# Altium PCB bdcmc25_revised.PcbDoc (part 1 of 4)
Units mil, origin at the board's own origin, x right, y up, seen from the top; angles counter-clockwise.
Board outline 7000 x 2750 mil, 4 copper layers (Top Layer, Layer 2 (GND), Layer 3 (GND), Bottom Layer), stack 23.756 mil thick; 347 components, 158 nets, 1046 pads, 1117 vias.
Unrouted connection lines stored in the file: 6.
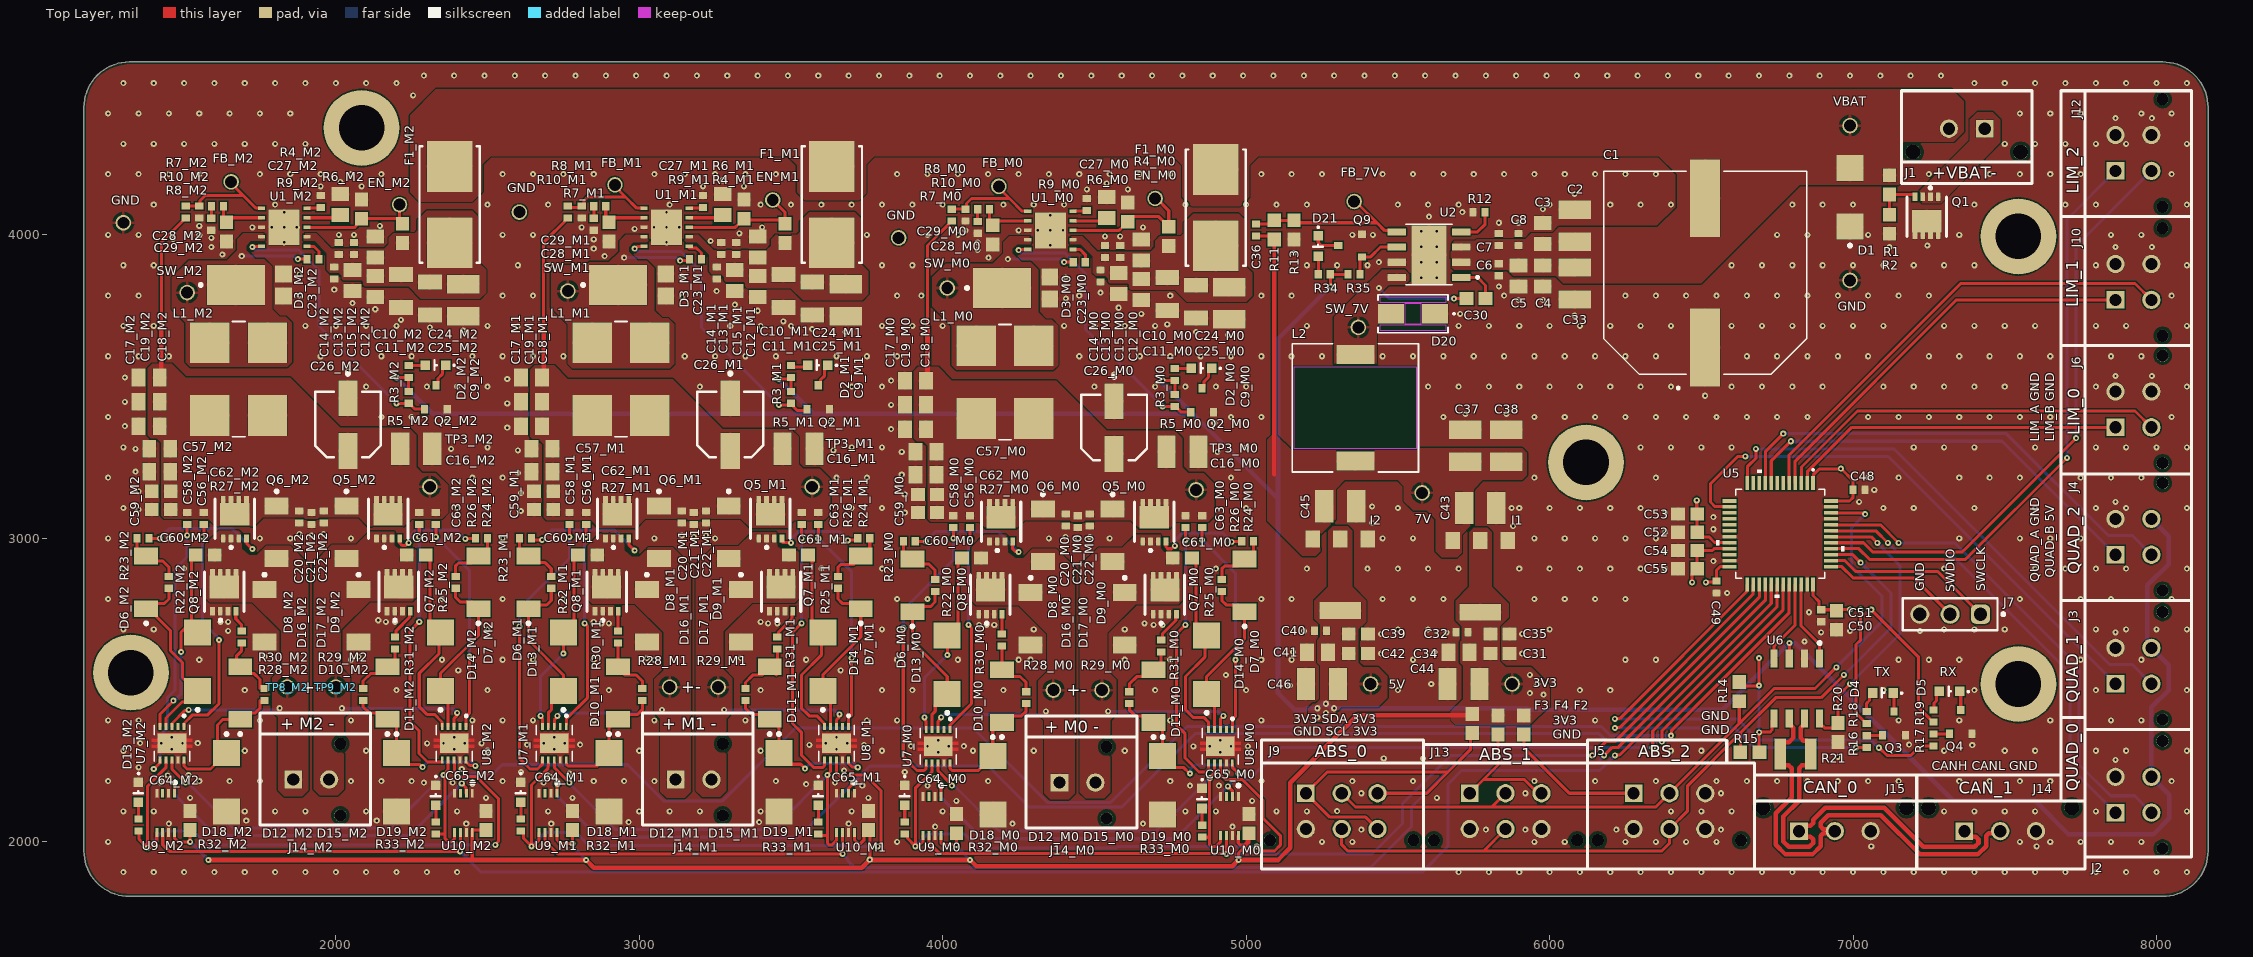
[diagram p0: Top Layer view]
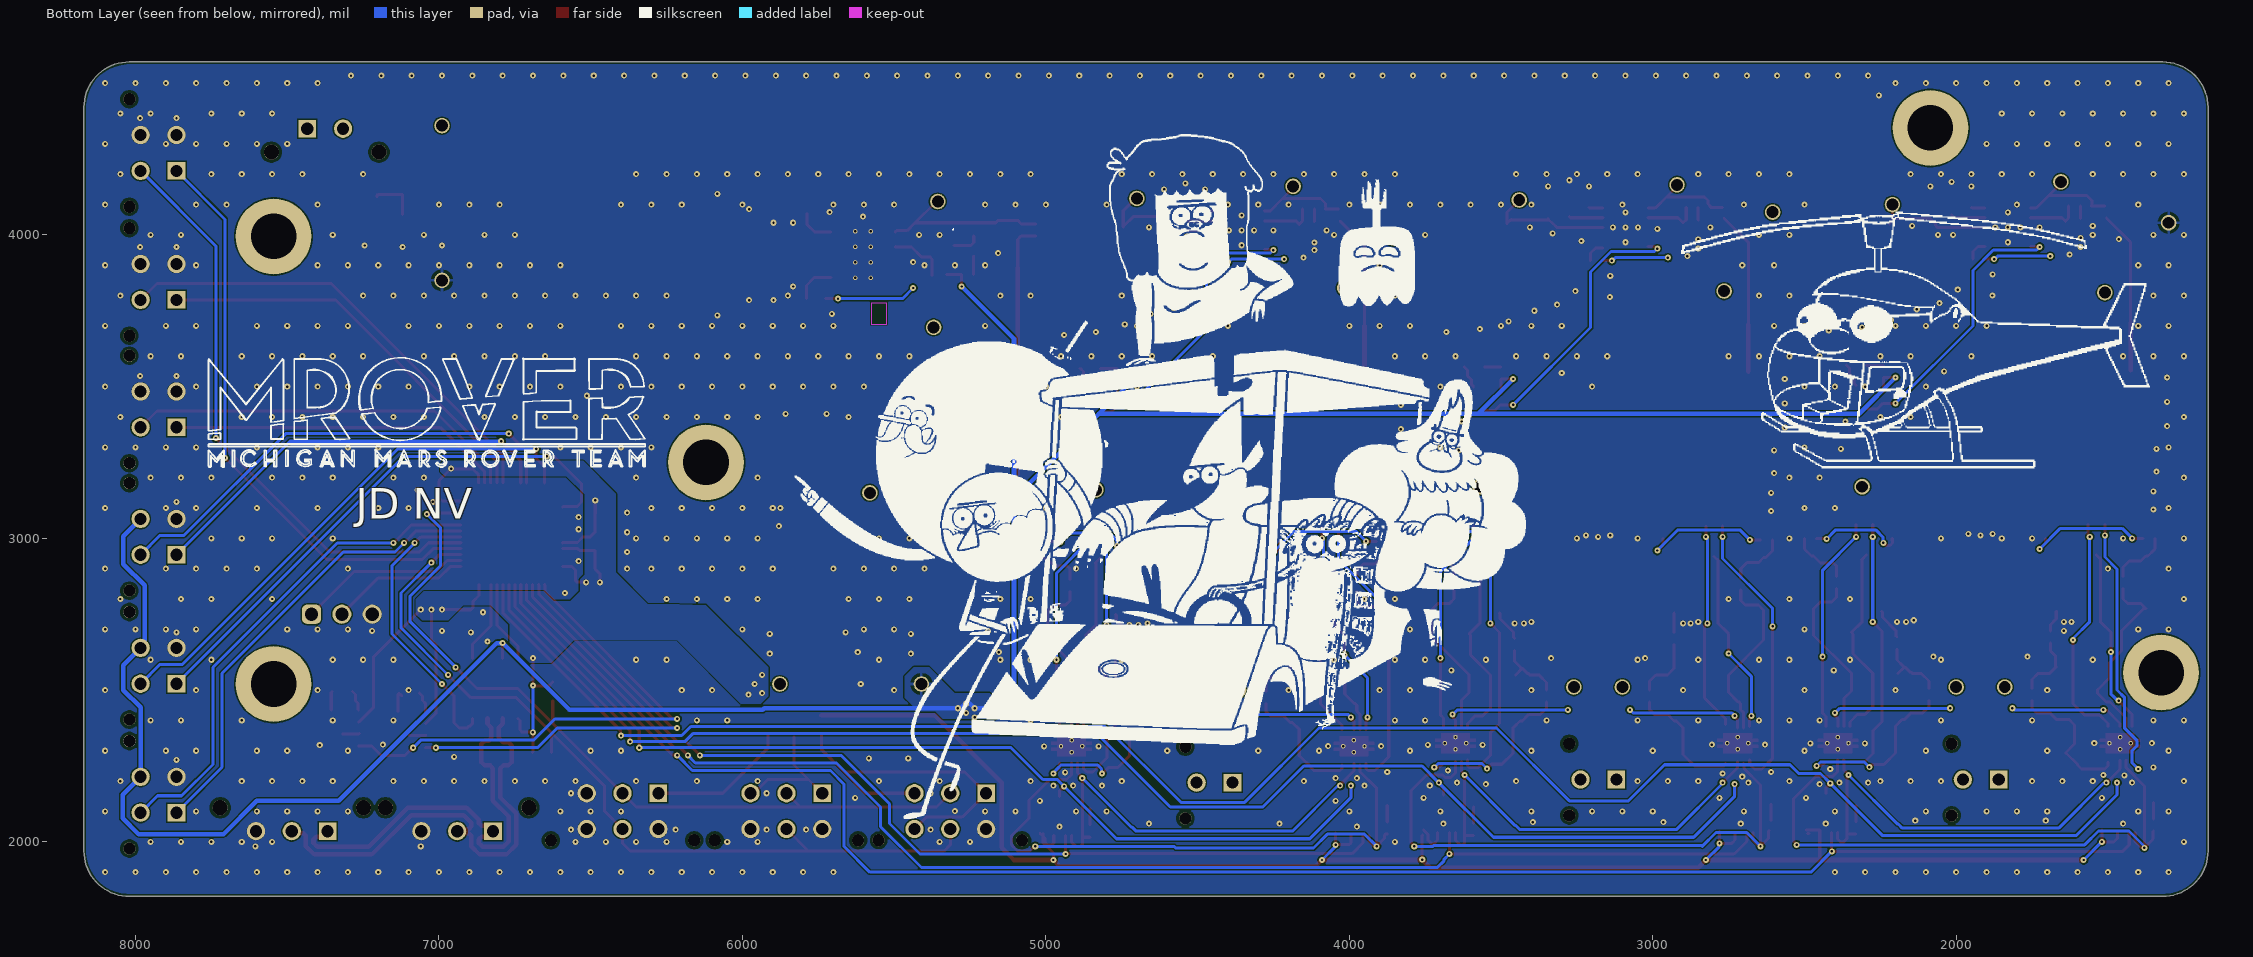
[diagram p1: Bottom Layer view, seen from below]
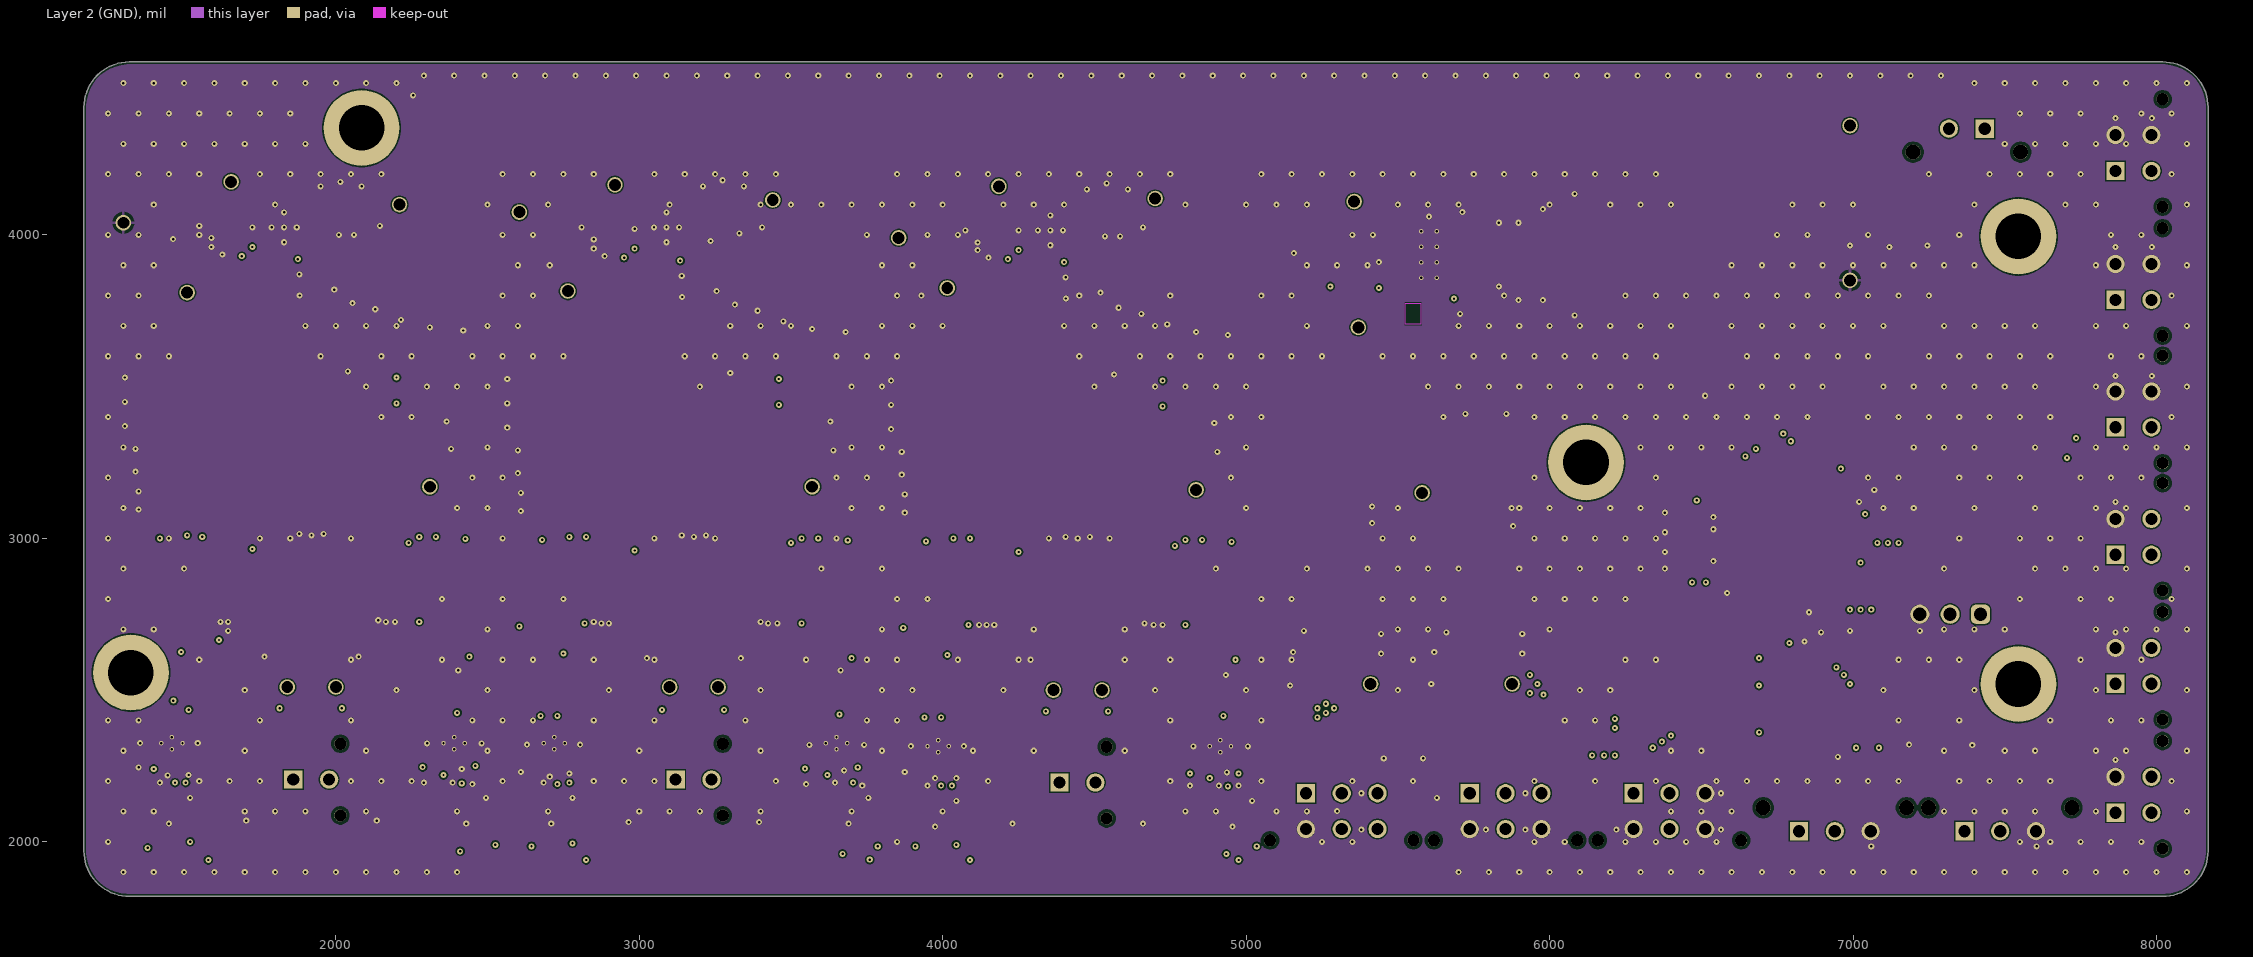
[diagram p2: Layer 2 (GND)]
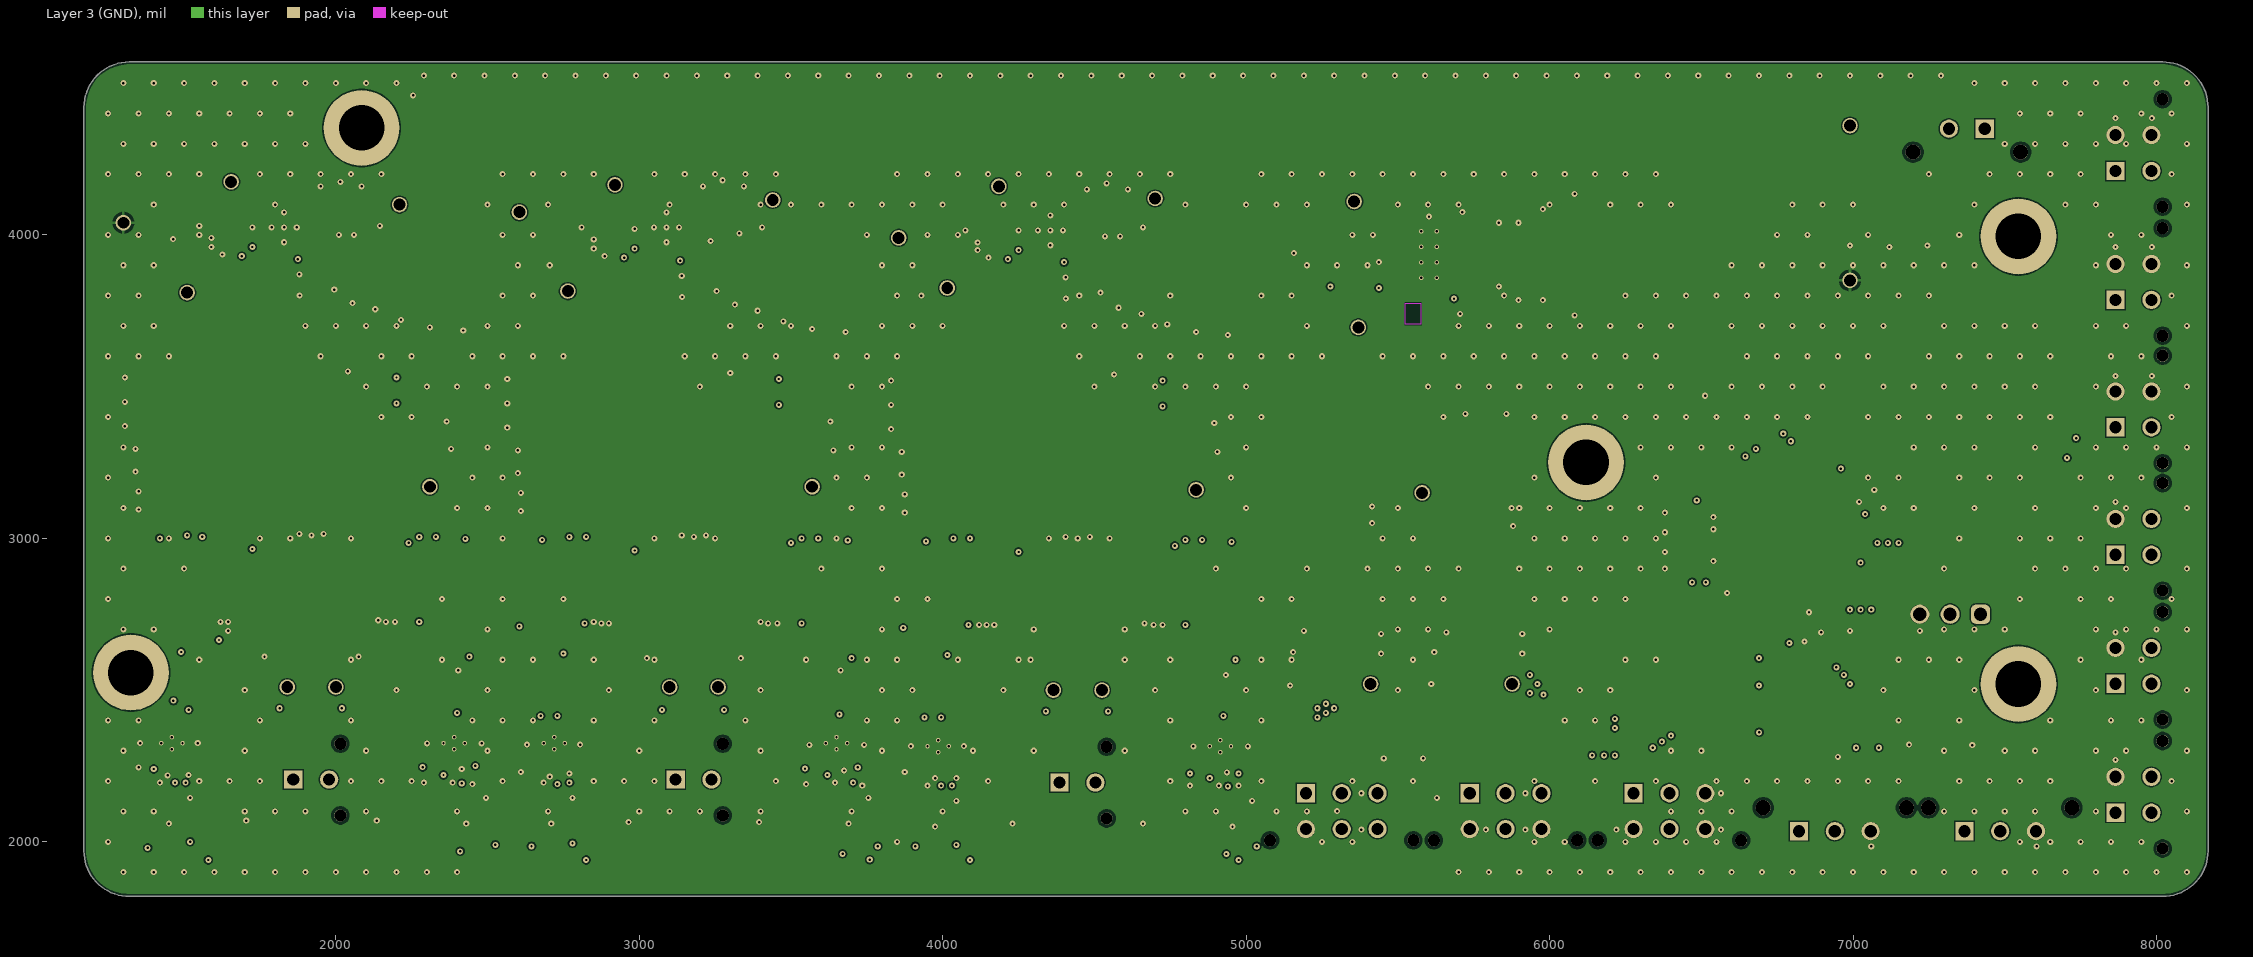
[diagram p3: Layer 3 (GND)]

## Layer stack, top to bottom
Top Solder: solder mask 0.4, Solder Resist, Dk 3.5
Top Layer: signal copper 1.4
Dielectric 2: prepreg 2.8, PP-006, Dk 4.1
Layer 2 (GND): signal copper 1.378
Dielectric 1: dielectric 12.6, FR-4, Dk 4.8
Layer 3 (GND): signal copper 1.378
Dielectric 5: prepreg 2.8, PP-006, Dk 4.1
Bottom Layer: signal copper 1.4
Bottom Solder: solder mask 0.4, Solder Resist, Dk 3.5

## Board outline
1170,1970 1170,4420 cw(c1320,4420) 1320,4570 8020,4570 cw(c8020,4420) 8170,4420 8170,1970 cw(c8020,1970) 8020,1820 1320,1820 cw(c1320,1970)

## Design rules (kind name [scope] priority, off if disabled: settings)
BoardOutlineClearance [All] p1: gap=7.87 ignorepadtopadclearanceinfootprint=FALSE
Clearance [All] p1: gap=4 ignorepadtopadclearanceinfootprint=FALSE except(5: Arc-Via Track-Via SMDPad-Via THPad-Via Via-Via Via-Fill Via-Poly Via-Region Via-Text; 9.84: Arc-Hole Track-Hole SMDPad-Hole THPad-Hole Via-Hole Fill-Hole Poly-Hole Region-Hole Text-Hole)
ComponentClearance [All] p1: gap=4 collisioncheckmode=3 verticalgap=4 showdistances=TRUE
DiffPairsRouting DiffPair_DiffPairsRouting [InDifferentialPair ('CAN')] p1: maxlimit=10 minlimit=10 mostfreqgap=10 toplayer_minwidth=15 toplayer_maxwidth=15 toplayer_prefwidth=15 midlayer1_minwidth=15 midlayer1_maxwidth=15 midlayer1_prefwidth=15 midlayer2_minwidth=15 midlayer2_maxwidth=15 midlayer2_prefwidth=15 bottomlayer_minwidth=15 bottomlayer_maxwidth=15 bottomlayer_prefwidth=15 maxuncoupledlength=500
DiffPairsRouting DiffPair_DiffPairsRouting_1 [InDifferentialPair ('CAN')] p2: maxlimit=5 minlimit=5 mostfreqgap=5 toplayer_minwidth=2 toplayer_maxwidth=2 toplayer_prefwidth=2 midlayer1_minwidth=0.59 midlayer1_maxwidth=0.59 midlayer1_prefwidth=0.59 midlayer2_minwidth=0.59 midlayer2_maxwidth=0.59 midlayer2_prefwidth=0.59 bottomlayer_minwidth=2 bottomlayer_maxwidth=2 bottomlayer_prefwidth=2 impedanceprofiledriven=TRUE impedanceprofileid={AFAFF1AD-85D3-44F0-8B6C-0EA1EA1200DB} impedanceprofilevalue=120.000000 maxuncoupledlength=500
DiffPairsRouting DiffPair_DiffPairsRouting_2 [InDifferentialPair ('CAN')] p3: maxlimit=10 minlimit=10 mostfreqgap=10 toplayer_minwidth=15 toplayer_maxwidth=15 toplayer_prefwidth=15 midlayer1_minwidth=15 midlayer1_maxwidth=15 midlayer1_prefwidth=15 midlayer2_minwidth=15 midlayer2_maxwidth=15 midlayer2_prefwidth=15 bottomlayer_minwidth=15 bottomlayer_maxwidth=15 bottomlayer_prefwidth=15 maxuncoupledlength=500
DiffPairsRouting [All] p4: maxlimit=4 minlimit=4 mostfreqgap=4 toplayer_minwidth=4 toplayer_maxwidth=71497.94 toplayer_prefwidth=4 midlayer1_minwidth=4 midlayer1_maxwidth=71497.94 midlayer1_prefwidth=4 midlayer2_minwidth=4 midlayer2_maxwidth=71497.94 midlayer2_prefwidth=4 bottomlayer_minwidth=4 bottomlayer_maxwidth=71497.94 bottomlayer_prefwidth=4 maxuncoupledlength=500
Height [All] p1: minheight=0 maxheight=71497.94 prefheight=500
HoleSize [All] p1: absolutevalues=TRUE maxlimit=248.03 minlimit=7.87 maxpercent=80.000 minpercent=20.000
HoleToHoleClearance [All] p1: gap=9.84 allowstackedmicrovias=FALSE
MatchedLengths DiffPair_MatchedLengths [InDifferentialPair ('CAN')] p1: tolerance=1000 checknetsindiffpair=FALSE checkdiffpairvsdiffpair=TRUE checkxsignals=TRUE checkothers=TRUE
MatchedLengths DiffPair_MatchedLengths_1 [InDifferentialPair ('CAN')] p2: tolerance=1000 checknetsindiffpair=FALSE checkdiffpairvsdiffpair=TRUE checkxsignals=TRUE checkothers=TRUE
MatchedLengths DiffPair_MatchedLengths_2 [InDifferentialPair ('CAN')] p3: tolerance=1000 checknetsindiffpair=FALSE checkdiffpairvsdiffpair=TRUE checkxsignals=TRUE checkothers=TRUE
MinimumAnnularRing [All] p1: minimumring=3
MinimumSolderMaskSliver [All] p1: minsoldermaskwidth=0
PlaneClearance [All] p1: clearance=4
PlaneConnect PlaneConnectPowerPads [InPadClass('PowerPads')] p1: planeconnectstyle=Direct reliefexpansion=20 reliefentries=4 reliefconductorwidth=10 reliefairgap=10
PlaneConnect [All] p2: pad.planeconnectstyle=Relief pad.reliefexpansion=11.81 pad.reliefentries=4 pad.reliefconductorwidth=4 pad.reliefairgap=4 via.planeconnectstyle=Direct via.reliefexpansion=11.81 via.reliefentries=4 via.reliefconductorwidth=5 via.reliefairgap=5
PolygonConnect PolygonConnect_1 [InNetClass('All Nets') vs InNet('No Net')] p1: connectstyle=Direct reliefconductorwidth=10 reliefentries=4 polygonreliefangle="90 Angle" airgapwidth=10
RoutingVias [All] p1: holewidth=7.87 width=17.72 viastyle="Through Hole" minholewidth=7.87 minwidth=17.72 maxholewidth=248.03 maxwidth=257.87
SilkToSilkClearance [All] p1: silktosilkclearance=0
SilkToSolderMaskClearance [IsPad] p1: minsilkscreentomaskgap=4 clearancetoexposedcopper=TRUE
SolderMaskExpansion [All] p1: expansion=2.95 istentingtop=FALSE
Width [All] p1: maxlimit=71497.94 minlimit=4 preferedwidth=4
20 further rules are at their usual default settings.

## Classes and differential pairs
channel class Motor_Control: M0 M1 M2
channel class 12V_Buck_Motor: M0 M1 M2
component class M2: C56_M2 C57_M2 C58_M2 C59_M2 C60_M2 C61_M2 C62_M2 C63_M2 C64_M2 C65_M2 D6_M2 D7_M2 D8_M2 D9_M2 D10_M2 D11_M2 D12_M2 D13_M2 D14_M2 D15_M2 D16_M2 D17_M2 D18_M2 D19_M2 J14_M2 Q5_M2 Q6_M2 Q7_M2 Q8_M2 R22_M2 R23_M2 R24_M2 R25_M2 R26_M2 R27_M2 R28_M2 R29_M2 R30_M2 R31_M2 R32_M2 R33_M2 TP8_M2 TP9_M2 U7_M2 U8_M2 U9_M2 U10_M2
component class M1: C56_M1 C57_M1 C58_M1 C59_M1 C60_M1 C61_M1 C62_M1 C63_M1 C64_M1 C65_M1 D6_M1 D7_M1 D8_M1 D9_M1 D10_M1 D11_M1 D12_M1 D13_M1 D14_M1 D15_M1 D16_M1 D17_M1 D18_M1 D19_M1 J14_M1 Q5_M1 Q6_M1 Q7_M1 Q8_M1 R22_M1 R23_M1 R24_M1 R25_M1 R26_M1 R27_M1 R28_M1 R29_M1 R30_M1 R31_M1 R32_M1 R33_M1 TP8_M1 TP9_M1 U7_M1 U8_M1 U9_M1 U10_M1
component class M0: C56_M0 C57_M0 C58_M0 C59_M0 C60_M0 C61_M0 C62_M0 C63_M0 C64_M0 C65_M0 D6_M0 D7_M0 D8_M0 D9_M0 D10_M0 D11_M0 D12_M0 D13_M0 D14_M0 D15_M0 D16_M0 D17_M0 D18_M0 D19_M0 J14_M0 Q5_M0 Q6_M0 Q7_M0 Q8_M0 R22_M0 R23_M0 R24_M0 R25_M0 R26_M0 R27_M0 R28_M0 R29_M0 R30_M0 R31_M0 R32_M0 R33_M0 TP8_M0 TP9_M0 U7_M0 U8_M0 U9_M0 U10_M0
component class "Input Power": C1 C2 C3 C4 C5 C6 C7 C8 D1 J1 Q1 R1 R2 TP1 TP2
component class Designator: C49 C50 C51 C52 C53 C54 C55 D4 D5 F2 F3 F4 F? J2 J3 J4 J5 J6 J7 J9 J10 J12 J13 J14 J15 Q3 Q4 R14 R15 R16 R17 R18 R19 R20 R21 TP7 U5 U6
differential pair CAN: +CAN_P -CAN_N

## Components (designator, comment, footprint, x,y, rotation, side; value= is the part's Value field where it differs from the comment)
3V3 "5003" TEST-POINT-0001#1 5876.5,2520 r0 top (schematic designator TP5)
5V "5003" TEST-POINT-0001#1 5410,2520 r0 top (schematic designator TP6)
7V "5003" TEST-POINT-0001#1 5580,3150 r0 top (schematic designator TP4)
C1 "EEETK2A101AM" CAP-100U-0001 6512.59,3875 r90 top
C2 "CL32B106KBJNNNE" CAP-1210 6082.59,4030 r270 top
C3 "CC0805KKX7R9BB105" CAP-0805 5977.59,4005 r270 top
C4 "CC0805KRX7R9BB104" CAP-0805 5977.59,3865 r90 top
C5 "GRM2195C1H103JA01D" CAP-0805 5897.59,3865 r90 top
C6 "CC0402KRX7R9BB102" CAP-0402 5832.59,3885 r90 top
C7 "CC0402JRNPO9BN101" CAP-0402 5832.59,3985 r270 top
C8 "CC0402JRNPO9BN100" CAP-0402 5897.59,3985 r270 top
C9_M0 "CL32B106KBJNNNE" CAP-1210 4945,3775 r90 top (schematic designator C9)
C9_M1 "CL32B106KBJNNNE" CAP-1210 3680,3785 r90 top (schematic designator C9)
C9_M2 "CL32B106KBJNNNE" CAP-1210 2420,3785 r90 top (schematic designator C9)
C10_M0 "CC0805KKX7R9BB105" CAP-0805 4655,3950 r270 top (schematic designator C10)
C10_M1 "CC0805KKX7R9BB105" CAP-0805 3390,3960 r270 top (schematic designator C10)
C10_M2 "CC0805KKX7R9BB105" CAP-0805 2130,3960 r270 top (schematic designator C10)
C11_M0 "CC0805KRX7R9BB104" CAP-0805 4655,3820 r90 top (schematic designator C11)
C11_M1 "CC0805KRX7R9BB104" CAP-0805 3390,3830 r90 top (schematic designator C11)
C11_M2 "CC0805KRX7R9BB104" CAP-0805 2130,3830 r90 top (schematic designator C11)
C12_M0 "GRM2195C1H103JA01D" CAP-0805 4580,3840 r90 top (schematic designator C12)
C12_M1 "GRM2195C1H103JA01D" CAP-0805 3315,3850 r90 top (schematic designator C12)
C12_M2 "GRM2195C1H103JA01D" CAP-0805 2055,3850 r90 top (schematic designator C12)
C13_M0 "CC0402JRNPO9BN101" CAP-0402 4520,3864.68 r90 top (schematic designator C13)
C13_M1 "CC0402JRNPO9BN101" CAP-0402 3255,3874.68 r90 top (schematic designator C13)
C13_M2 "CC0402JRNPO9BN101" CAP-0402 1995,3874.68 r90 top (schematic designator C13)
C14_M0 "CC0402JRNPO9BN100" CAP-0402 4535,3945 r270 top (schematic designator C14)
C14_M1 "CC0402JRNPO9BN100" CAP-0402 3270,3955 r270 top (schematic designator C14)
C14_M2 "CC0402JRNPO9BN100" CAP-0402 2010,3955 r270 top (schematic designator C14)
C15_M0 "CC0402KRX7R9BB102" CAP-0402 4585,3945 r270 top (schematic designator C15)
C15_M1 "CC0402KRX7R9BB102" CAP-0402 3320,3955 r270 top (schematic designator C15)
C15_M2 "CC0402KRX7R9BB102" CAP-0402 2060,3955 r270 top (schematic designator C15)
C16_M0 "CL32B106KBJNNNE" CAP-1210 4790,3285 r180 top (schematic designator C16)
C16_M1 "CL32B106KBJNNNE" CAP-1210 3525,3295 r180 top (schematic designator C16)
C16_M2 "CL32B106KBJNNNE" CAP-1210 2265,3295 r180 top (schematic designator C16)
C17_M0 "CC0805KKX7R9BB105" CAP-0805 3910,3520 r0 top (schematic designator C17)
C17_M1 "CC0805KKX7R9BB105" CAP-0805 2645,3530 r0 top (schematic designator C17)
C17_M2 "CC0805KKX7R9BB105" CAP-0805 1385,3530 r0 top (schematic designator C17)
C18_M0 "CC0805KRX7R9BB104" CAP-0805 3910,3440 r0 top (schematic designator C18)
C18_M1 "CC0805KRX7R9BB104" CAP-0805 2645,3450 r0 top (schematic designator C18)
C18_M2 "CC0805KRX7R9BB104" CAP-0805 1385,3450 r0 top (schematic designator C18)
C19_M0 "GRM2195C1H103JA01D" CAP-0805 3910,3360 r0 top (schematic designator C19)
C19_M1 "GRM2195C1H103JA01D" CAP-0805 2645,3370 r0 top (schematic designator C19)
C19_M2 "GRM2195C1H103JA01D" CAP-0805 1385,3370 r0 top (schematic designator C19)
C20_M0 "CC0402KRX7R9BB102" CAP-0402 4405,3060 r90 top (schematic designator C20)
C20_M1 "CC0402KRX7R9BB102" CAP-0402 3140,3070 r90 top (schematic designator C20)
C20_M2 "CC0402KRX7R9BB102" CAP-0402 1880,3070 r90 top (schematic designator C20)
C21_M0 "CC0402JRNPO9BN101" CAP-0402 4445,3055 r90 top (schematic designator C21)
C21_M1 "CC0402JRNPO9BN101" CAP-0402 3180,3065 r90 top (schematic designator C21)
C21_M2 "CC0402JRNPO9BN101" CAP-0402 1920,3065 r90 top (schematic designator C21)
C22_M0 "CC0402JRNPO9BN100" CAP-0402 4485,3060 r90 top (schematic designator C22)
C22_M1 "CC0402JRNPO9BN100" CAP-0402 3220,3070 r90 top (schematic designator C22)
C22_M2 "CC0402JRNPO9BN100" CAP-0402 1960,3070 r90 top (schematic designator C22)
C23_M0 "CC0402KRX7R7BB104" CAP-0402 4450,3910 r180 top (schematic designator C23)
C23_M1 "CC0402KRX7R7BB104" CAP-0402 3185,3920 r180 top (schematic designator C23)
C23_M2 "CC0402KRX7R7BB104" CAP-0402 1925,3920 r180 top (schematic designator C23)
C24_M0 "CC1206KKX7R0BB225" CAP-1206 4740,3805 r90 top (schematic designator C24)
C24_M1 "CC1206KKX7R0BB225" CAP-1206 3475,3815 r90 top (schematic designator C24)
C24_M2 "CC1206KKX7R0BB225" CAP-1206 2215,3815 r90 top (schematic designator C24)
C25_M0 "CC1206KKX7R0BB225" CAP-1206 4835,3780 r90 top (schematic designator C25)
C25_M1 "CC1206KKX7R0BB225" CAP-1206 3570,3790 r90 top (schematic designator C25)
C25_M2 "CC1206KKX7R0BB225" CAP-1206 2310,3790 r90 top (schematic designator C25)
C26_M0 "16SVPG47M" CAP-47U-0001 4565,3365 r270 top (schematic designator C26)
C26_M1 "16SVPG47M" CAP-47U-0001 3300,3375 r270 top (schematic designator C26)
C26_M2 "16SVPG47M" CAP-47U-0001 2040,3375 r270 top (schematic designator C26)
C27_M0 "GRM2165C1H272JA01D" CAP-0805 4540,4090 r270 top (schematic designator C27)
C27_M1 "GRM2165C1H272JA01D" CAP-0805 3275,4100 r270 top (schematic designator C27)
C27_M2 "GRM2165C1H272JA01D" CAP-0805 2015,4100 r270 top (schematic designator C27)
C28_M0 "CC0603CRNPO0BN6R8" CAP-0603 4165,4000 r90 top (schematic designator C28)
C28_M1 "CC0603CRNPO0BN6R8" CAP-0603 2900,4010 r90 top (schematic designator C28)
C28_M2 "CC0603CRNPO0BN6R8" CAP-0603 1640,4010 r90 top (schematic designator C28)
C29_M0 "0402N511J500CT" CAP-0402 4115,4025 r90 top (schematic designator C29)
C29_M1 "0402N511J500CT" CAP-0402 2850,4035 r90 top (schematic designator C29)
C29_M2 "0402N511J500CT" CAP-0402 1590,4035 r90 top (schematic designator C29)
C30 "CC0603KRX7R0BB104" CAP-0603 5757.59,3790 r180 top
C31 "CC0603KRX5R6BB106" CAP-0603 5836.5,2620 r180 top
C32 "CC0402KRX7R7BB104" CAP-0402 5711.5,2690 r0 top
C33 "CL32B106KBJNNNE" CAP-1210 6082.59,3840 r90 top
C34 "CC0805JRNPO9BN471" CAP-0805 5701.5,2625 r0 top
C35 "CC0603KRX7R0BB104" CAP-0603 5836.5,2685 r180 top
C36 "GRM155R71H391KA01D" CAP-0402 5032.59,4016.5 r90 top
C37 "C5750X5R1A686MT000N" CAP-1210 5722.59,3305 r270 top
C38 "C5750X5R1A686MT000N" CAP-1210 5857.59,3305 r270 top
C39 "CC0603KRX5R6BB106" CAP-0603 5370,2685 r180 top
C40 "CC0402KRX7R7BB104" CAP-0402 5245,2695 r0 top
C41 "CC0805JRNPO9BN471" CAP-0805 5235,2625 r0 top
C42 "CC0603KRX7R0BB104" CAP-0603 5370,2620 r180 top
C43 "293D106X9016A2TE3" CAP-1210 5771.5,3100 r180 top
C44 "293D106X9016A2TE3" CAP-1210 5716.5,2520 r0 top
C45 "293D106X9016A2TE3" CAP-1210 5310,3105 r180 top
C46 "293D106X9016A2TE3" CAP-1210 5250,2520 r0 top
C48 "CC0402KRX7R7BB104" CAP-0402 7020,3160 r180 top
C49 "CC0402KRX7R7BB104" CAP-0402 6550,2840 r90 top
C50 "CC0402KRX7R7BB104" CAP-0402 6895,2745 r90 top
C51 "CC0603KRX5R8BB475" CAP-0603 6945,2730 r90 top
C52 "CC0603KPX7R9BB103" CAP-0603 6455,3020 r0 top
C53 "CC0603KRX7R7BB105" CAP-0603 6455,3080 r0 top
C54 "CC0603KPX7R9BB103" CAP-0603 6455,2960 r0 top
C55 "CC0603KRX7R7BB105" CAP-0603 6455,2900 r0 top
C56_M0 "CC0805KKX7R9BB105" CAP-0805 3945,3210 r0 top (schematic designator C56)
C56_M1 "CC0805KKX7R9BB105" CAP-0805 2680,3220 r0 top (schematic designator C56)
C56_M2 "CC0805KKX7R9BB105" CAP-0805 1420,3220 r0 top (schematic designator C56)
C57_M0 "CC0805KKX7R9BB105" CAP-0805 3945,3285 r180 top (schematic designator C57)
C57_M1 "CC0805KKX7R9BB105" CAP-0805 2680,3295 r180 top (schematic designator C57)
C57_M2 "CC0805KKX7R9BB105" CAP-0805 1420,3295 r180 top (schematic designator C57)
C58_M0 "CC0603KPX7R9BB103" CAP-0603 3950,3145 r0 top (schematic designator C58)
C58_M1 "CC0603KPX7R9BB103" CAP-0603 2685,3155 r0 top (schematic designator C58)
C58_M2 "CC0603KPX7R9BB103" CAP-0603 1425,3155 r0 top (schematic designator C58)
C59_M0 "CC0603KPX7R9BB103" CAP-0603 3950,3085 r180 top (schematic designator C59)
C59_M1 "CC0603KPX7R9BB103" CAP-0603 2685,3095 r180 top (schematic designator C59)
C59_M2 "CC0603KPX7R9BB103" CAP-0603 1425,3095 r180 top (schematic designator C59)
C60_M0 "CC0603KRX7R0BB104" CAP-0603 4095,2935 r180 top (schematic designator C60)
C60_M1 "CC0603KRX7R0BB104" CAP-0603 2830,2945 r180 top (schematic designator C60)
C60_M2 "CC0603KRX7R0BB104" CAP-0603 1570,2945 r180 top (schematic designator C60)
C61_M0 "CC0603KRX7R0BB104" CAP-0603 4790,2935 r0 top (schematic designator C61)
C61_M1 "CC0603KRX7R0BB104" CAP-0603 3525,2945 r0 top (schematic designator C61)
C61_M2 "CC0603KRX7R0BB104" CAP-0603 2265,2945 r0 top (schematic designator C61)
C62_M0 "CC0402KRX7R9BB102" CAP-0402 4035,3055 r270 top (schematic designator C62)
C62_M1 "CC0402KRX7R9BB102" CAP-0402 2770,3065 r270 top (schematic designator C62)
C62_M2 "CC0402KRX7R9BB102" CAP-0402 1510,3065 r270 top (schematic designator C62)
C63_M0 "CC0402KRX7R9BB102" CAP-0402 4800,3055 r90 top (schematic designator C63)
C63_M1 "CC0402KRX7R9BB102" CAP-0402 3535,3065 r90 top (schematic designator C63)
C63_M2 "CC0402KRX7R9BB102" CAP-0402 2275,3065 r90 top (schematic designator C63)
C64_M0 "CC0603KRX7R0BB104" CAP-0603 4045,2060 r90 top (schematic designator C64)
C64_M1 "CC0603KRX7R0BB104" CAP-0603 2780,2070 r90 top (schematic designator C64)
C64_M2 "CC0603KRX7R0BB104" CAP-0603 1520,2070 r90 top (schematic designator C64)
C65_M0 "CC0603KRX7R0BB104" CAP-0603 5010,2060 r90 top (schematic designator C65)
C65_M1 "CC0603KRX7R0BB104" CAP-0603 3755,2070 r90 top (schematic designator C65)
C65_M2 "CC0603KRX7R0BB104" CAP-0603 2495,2070 r90 top (schematic designator C65)
D1 "SMBJ40CA" "DO-214AA (SMBJ)" 6990,4125 r270 top
D2_M0 "BL-HKC36G-AV-TRB" LED-0603 4910,3590 r180 top (schematic designator D2)
D2_M1 "BL-HKC36G-AV-TRB" LED-0603 3645,3600 r180 top (schematic designator D2)
D2_M2 "BL-HKC36G-AV-TRB" LED-0603 2385,3600 r180 top (schematic designator D2)
D3_M0 "PDS760-13" DO-POWERDI5 4240,3825 r180 top (schematic designator D3)
D3_M1 "PDS760-13" DO-POWERDI5 2975,3835 r180 top (schematic designator D3)
D3_M2 "PDS760-13" DO-POWERDI5 1715,3835 r180 top (schematic designator D3)
D4 "BL-HKC36G-AV-TRB" LED-0603 7155,2520 r180 top
D5 "BL-HKC36G-AV-TRB" LED-0603 7375,2525 r180 top
D6_M0 "PMEG6030EP,115" DIO-SOD128 3900,2845 r0 top (schematic designator D6)
D6_M1 "PMEG6030EP,115" DIO-SOD128 2635,2855 r0 top (schematic designator D6)
D6_M2 "PMEG6030EP,115" DIO-SOD128 1375,2855 r0 top (schematic designator D6)
D7_M0 "PMEG6030EP,115" DIO-SOD128 4995,2845 r0 top (schematic designator D7)
D7_M1 "PMEG6030EP,115" DIO-SOD128 3730,2855 r0 top (schematic designator D7)
D7_M2 "PMEG6030EP,115" DIO-SOD128 2470,2855 r0 top (schematic designator D7)
D8_M0 "PMEG6030EP,115" DIO-SOD128 4330,3010 r180 top (schematic designator D8)
D8_M1 "PMEG6030EP,115" DIO-SOD128 3065,3020 r180 top (schematic designator D8)
D8_M2 "PMEG6030EP,115" DIO-SOD128 1805,3020 r180 top (schematic designator D8)
D9_M0 "PMEG6030EP,115" DIO-SOD128 4560,3010 r180 top (schematic designator D9)
D9_M1 "PMEG6030EP,115" DIO-SOD128 3295,3020 r180 top (schematic designator D9)
D9_M2 "PMEG6030EP,115" DIO-SOD128 2035,3020 r180 top (schematic designator D9)
D10_M0 "PMEG6030EP,115" DIO-SOD128 4195,2480 r0 top (schematic designator D10)
D10_M1 "PMEG6030EP,115" DIO-SOD128 2930,2490 r0 top (schematic designator D10)
D10_M2 "PMEG6030EP,115" DIO-SOD128 1685,2490 r0 top (schematic designator D10)
D11_M0 "PMEG6030EP,115" DIO-SOD128 4695,2480 r0 top (schematic designator D11)
D11_M1 "PMEG6030EP,115" DIO-SOD128 3430,2490 r0 top (schematic designator D11)
D11_M2 "PMEG6030EP,115" DIO-SOD128 2170,2490 r0 top (schematic designator D11)
D12_M0 "SMBJ12CA" "DO-214AA (SMBJ)" 4165,2185 r90 top (schematic designator D12)
D12_M1 "SMBJ12CA" "DO-214AA (SMBJ)" 2900,2195 r90 top (schematic designator D12)
D12_M2 "SMBJ12CA" "DO-214AA (SMBJ)" 1640,2195 r90 top (schematic designator D12)
D13_M0 "SMBJ12CA" "DO-214AA (SMBJ)" 4015,2585 r270 top (schematic designator D13)
D13_M1 "SMBJ12CA" "DO-214AA (SMBJ)" 2750,2595 r270 top (schematic designator D13)
D13_M2 "SMBJ12CA" "DO-214AA (SMBJ)" 1545,2595 r270 top (schematic designator D13)
D14_M0 "SMBJ12CA" "DO-214AA (SMBJ)" 4870,2585 r270 top (schematic designator D14)
D14_M1 "SMBJ12CA" "DO-214AA (SMBJ)" 3605,2595 r270 top (schematic designator D14)
D14_M2 "SMBJ12CA" "DO-214AA (SMBJ)" 2345,2595 r270 top (schematic designator D14)
D15_M0 "SMBJ12CA" "DO-214AA (SMBJ)" 4725,2185 r90 top (schematic designator D15)
D15_M1 "SMBJ12CA" "DO-214AA (SMBJ)" 3460,2195 r90 top (schematic designator D15)
D15_M2 "SMBJ12CA" "DO-214AA (SMBJ)" 2200,2195 r90 top (schematic designator D15)
D16_M0 "PMEG6030EP,115" DIO-SOD128 4290,2735 r180 top (schematic designator D16)
D16_M1 "PMEG6030EP,115" DIO-SOD128 3025,2745 r180 top (schematic designator D16)
D16_M2 "PMEG6030EP,115" DIO-SOD128 1765,2745 r180 top (schematic designator D16)
D17_M0 "PMEG6030EP,115" DIO-SOD128 4600,2735 r180 top (schematic designator D17)
D17_M1 "PMEG6030EP,115" DIO-SOD128 3335,2745 r180 top (schematic designator D17)
D17_M2 "PMEG6030EP,115" DIO-SOD128 2075,2745 r180 top (schematic designator D17)
D18_M0 "BL-HKC36G-AV-TRB" LED-0603 3845,2210 r270 top (schematic designator D18)
D18_M1 "BL-HKC36G-AV-TRB" LED-0603 2580,2220 r270 top (schematic designator D18)
D18_M2 "BL-HKC36G-AV-TRB" LED-0603 1320,2220 r270 top (schematic designator D18)
D19_M0 "BL-HKC36G-AV-TRB" LED-0603 4825,2200 r270 top (schematic designator D19)
D19_M1 "BL-HKC36G-AV-TRB" LED-0603 3560,2210 r270 top (schematic designator D19)
D19_M2 "BL-HKC36G-AV-TRB" LED-0603 2300,2210 r270 top (schematic designator D19)
D20 "SS1200" SMA_DIO 5550,3740 r180 top
D21 "BL-HKC36G-AV-TRB" LED-0603 5207.59,4020 r270 top
EN_M0 "Comment" TEST-POINT-0001#1 4700,4120 r0 top
EN_M1 "Comment" TEST-POINT-0001#1 3440,4115 r0 top
EN_M2 "Comment" TEST-POINT-0001#1 2210,4100 r0 top
F1_M0 "01550900M" FUSE-0001 4900,4090 r270 top (schematic designator F1)
F1_M1 "01550900M" FUSE-0001 3635,4100 r270 top (schematic designator F1)
F1_M2 "01550900M" FUSE-0001 2375,4100 r270 top (schematic designator F1)
F2 "0467.250NRHF" RES-0603 5915,2385 r270 top
F3 "0467.250NRHF" RES-0603 5745,2390 r270 top
F4 "0467.250NRHF" RES-0603 5830,2385 r270 top
FB_7V "Comment" TEST-POINT-0001#1 5356.08,4110.06 r0 top
FB_M0 "Comment" TEST-POINT-0001#1 4185,4160 r0 top
FB_M1 "Comment" TEST-POINT-0001#1 2920,4165 r0 top
FB_M2 "Comment" TEST-POINT-0001#1 1655,4175 r0 top
GND "Comment" TEST-POINT-0001#1 3855,3990 r0 top
GND "Comment" TEST-POINT-0001#1 2605,4075 r0 top
GND "5003" TEST-POINT-0001#1 1300,4040 r0 top (schematic designator TP7)
GND "5003" TEST-POINT-0001#1 6990,3850 r0 top (schematic designator TP2)
I1 "LM1117IMPX-3.3/NOPB" IC-SOT-223-4 5771.5,2875 r270 top
I2 "LM1117MPX-5.0/NOPB" IC-SOT-223-4 5310,2880 r270 top
J1 "0436500215" CONN-2POS-0002 7375,4350 r0 top
J2 "Molex 43045-0412" CONN-4POS-0002 7865,2155 r270 top
J3 "Molex 43045-0412" CONN-4POS-0002 7865,2580 r270 top
J4 "Molex 43045-0412" CONN-4POS-0002 7865,3005 r270 top
J5 "Molex 43045-0612" CONN-6POS-0001 6395,2160 r180 top
J6 "Molex 43045-0412" CONN-4POS-0002 7865,3425 r270 top
J7 "61300311121" CONN-3POS-0001 7320,2750 r180 top
J9 "Molex 43045-0612" CONN-6POS-0001 5315,2160 r180 top
J10 "Molex 43045-0412" CONN-4POS-0002 7865,3845 r270 top
J12 "Molex 43045-0412" CONN-4POS-0002 7865,4270 r270 top
J13 "Molex 43045-0612" CONN-6POS-0001 5855,2160 r180 top
J14 "Molex 43650-0315" 43650-0315 7485,2035 r180 top
J14_M0 "0430450212" CONN-2POS-0001 4385,2195 r270 top (schematic designator J14)
J14_M1 "0430450212" CONN-2POS-0001 3120,2205 r270 top (schematic designator J14)
J14_M2 "0430450212" CONN-2POS-0001 1860,2205 r270 top (schematic designator J14)
J15 "Molex 43650-0315" 43650-0315 6940,2035 r180 top
L1_M0 "CSAD1010-150M" IND-15U-0002 3985,3335 r0 top (schematic designator L1)
L1_M1 "CSAD1010-150M" IND-15U-0002 2720,3345 r0 top (schematic designator L1)
L1_M2 "CSAD1010-150M" IND-15U-0002 1460,3345 r0 top (schematic designator L1)
L2 "CSAD1010-150M" IND-15UH-0001 5360,3430 r270 top
Q1 "CSD18543Q3AT" IC-8VSONCLIP 7315,4160 r180 top
Q2_M0 "T2N7002AK,LM" IC-SOT23-3 4855,3455 r0 top (schematic designator Q2)
Q2_M1 "T2N7002AK,LM" IC-SOT23-3 3590,3465 r0 top (schematic designator Q2)
Q2_M2 "T2N7002AK,LM" IC-SOT23-3 2330,3465 r0 top (schematic designator Q2)
Q3 "T2N7002AK,LM" IC-SOT23-3 7135,2390 r0 top
Q4 "T2N7002AK,LM" IC-SOT23-3 7355,2395 r0 top
Q5_M0 "CSD17575Q3" IC-8VSONCLIP 4625,2955 r0 top (schematic designator Q5)
Q5_M1 "CSD17575Q3" IC-8VSONCLIP 3360,2965 r0 top (schematic designator Q5)
Q5_M2 "CSD17575Q3" IC-8VSONCLIP 2100,2965 r0 top (schematic designator Q5)
Q6_M0 "CSD17575Q3" IC-8VSONCLIP 4120,2955 r0 top (schematic designator Q6)
Q6_M1 "CSD17575Q3" IC-8VSONCLIP 2855,2965 r0 top (schematic designator Q6)
Q6_M2 "CSD17575Q3" IC-8VSONCLIP 1595,2965 r0 top (schematic designator Q6)
Q7_M0 "CSD17575Q3" IC-8VSONCLIP 4660,2715 r0 top (schematic designator Q7)
Q7_M1 "CSD17575Q3" IC-8VSONCLIP 3395,2725 r0 top (schematic designator Q7)
Q7_M2 "CSD17575Q3" IC-8VSONCLIP 2135,2725 r0 top (schematic designator Q7)
Q8_M0 "CSD17575Q3" IC-8VSONCLIP 4085,2715 r0 top (schematic designator Q8)
Q8_M1 "CSD17575Q3" IC-8VSONCLIP 2820,2725 r0 top (schematic designator Q8)
Q8_M2 "CSD17575Q3" IC-8VSONCLIP 1560,2725 r0 top (schematic designator Q8)
Q9 "T2N7002AK,LM" IC-SOT23-3 5342.59,3965 r90 top
R1 "RC0603FR-07200KL" RES-0603 7120,4165 r270 top
R2 "RC0603FR-07100KL" RES-0603 7120,4035 r270 top
R3_M0 "RC0402FR-07240RL" RES-0402 4765,3539.68 r270 top (schematic designator R3)
R3_M1 "RC0402FR-07240RL" RES-0402 3500,3549.68 r270 top (schematic designator R3)
R3_M2 "RC0402FR-07240RL" RES-0402 2240,3549.68 r270 top (schematic designator R3)
R4_M0 "RC0603FR-072M15L" RES-0603 4745,3995 r270 top (schematic designator R4)
R4_M1 "RC0603FR-072M15L" RES-0603 3480,4005 r270 top (schematic designator R4)
R4_M2 "RC0603FR-072M15L" RES-0603 2220,4005 r270 top (schematic designator R4)
R5_M0 "RC0402FR-071KL" RES-0402 4765,3454.68 r90 top (schematic designator R5)
R5_M1 "RC0402FR-071KL" RES-0402 3500,3464.68 r90 top (schematic designator R5)
R5_M2 "RC0402FR-071KL" RES-0402 2240,3464.68 r90 top (schematic designator R5)
R6_M0 "RC0603FR-07100KL" RES-0603 4610,4075 r270 top (schematic designator R6)
R6_M1 "RC0603FR-07100KL" RES-0603 3345,4085 r270 top (schematic designator R6)
R6_M2 "RC0603FR-07100KL" RES-0603 2085,4085 r270 top (schematic designator R6)
R7_M0 "RC0402FR-07147KL" RES-0402 4030,4065 r270 top (schematic designator R7)
R7_M1 "RC0402FR-07147KL" RES-0402 2765,4075 r270 top (schematic designator R7)
R7_M2 "RC0402FR-07147KL" RES-0402 1505,4075 r270 top (schematic designator R7)
R8_M0 "RC0402FR-0759KL" RES-0402 4135,4085 r0 top (schematic designator R8)
R8_M1 "RC0402FR-0759KL" RES-0402 2870,4095 r0 top (schematic designator R8)
R8_M2 "RC0402FR-0759KL" RES-0402 1610,4095 r0 top (schematic designator R8)
R9_M0 "RTT021783FTH" RES-0402 4475,4100 r270 top (schematic designator R9)
R9_M1 "RTT021783FTH" RES-0402 3210,4110 r270 top (schematic designator R9)
R9_M2 "RTT021783FTH" RES-0402 1950,4110 r270 top (schematic designator R9)
R10_M0 "RC0402FR-0710K5L" RES-0402 4075,4065 r90 top (schematic designator R10)
R10_M1 "RC0402FR-0710K5L" RES-0402 2810,4075 r90 top (schematic designator R10)
R10_M2 "RC0402FR-0710K5L" RES-0402 1550,4075 r90 top (schematic designator R10)
R11 "RC0603FR-07100KL" RES-0603 5092.59,4016.5 r270 top
R12 "RC0402FR-0745K3L" RES-0402 5767.59,4075 r0 top
R13 "RC0603FR-0712KL" RES-0603 5157.59,4016.5 r90 top
R14 "RC0603FR-074K7L" RES-0603 6625,2495 r270 top
R15 "RC0603FR-074K7L" RES-0603 6660,2295 r180 top
R16 "RC0402FR-07470RL" RES-0402 7045,2330 r270 top
R17 "RC0402FR-07470RL" RES-0402 7265,2335 r270 top
R18 "RC0402FR-07100RL" RES-0402 7045,2410 r270 top
R19 "RC0402FR-07100RL" RES-0402 7265,2415 r270 top
R20 "RC0603FR-074K7L" RES-0603 6950,2360 r270 top
R21 "RC1210FR-07120RL" RES-1210 6810,2290 r180 top
R22_M0 "RC0402FR-7W33RL" RES-0402 3975,2845 r90 top (schematic designator R22)
R22_M1 "RC0402FR-7W33RL" RES-0402 2710,2855 r90 top (schematic designator R22)
R22_M2 "RC0402FR-7W33RL" RES-0402 1450,2855 r90 top (schematic designator R22)
R23_M0 "RC0402FR-7W33RL" RES-0402 3890,2990 r0 top (schematic designator R23)
R23_M1 "RC0402FR-7W33RL" RES-0402 2625,3000 r0 top (schematic designator R23)
R23_M2 "RC0402FR-7W33RL" RES-0402 1365,3000 r0 top (schematic designator R23)
R24_M0 "RC0402FR-7W33RL" RES-0402 5005,2990 r0 top (schematic designator R24)
R24_M1 "RC0402FR-7W33RL" RES-0402 3740,3000 r0 top (schematic designator R24)
R24_M2 "RC0402FR-7W33RL" RES-0402 2480,3000 r0 top (schematic designator R24)
R25_M0 "RC0402FR-7W33RL" RES-0402 4920,2845 r90 top (schematic designator R25)
R25_M1 "RC0402FR-7W33RL" RES-0402 3655,2855 r90 top (schematic designator R25)
R25_M2 "RC0402FR-7W33RL" RES-0402 2395,2855 r90 top (schematic designator R25)
R26_M0 "ERJ2GEJ1R0X" RES-0402 4855,3055 r90 top (schematic designator R26)
R26_M1 "ERJ2GEJ1R0X" RES-0402 3590,3065 r90 top (schematic designator R26)
R26_M2 "ERJ2GEJ1R0X" RES-0402 2330,3065 r90 top (schematic designator R26)
R27_M0 "ERJ2GEJ1R0X" RES-0402 4090,3055 r90 top (schematic designator R27)
R27_M1 "ERJ2GEJ1R0X" RES-0402 2825,3065 r90 top (schematic designator R27)
R27_M2 "ERJ2GEJ1R0X" RES-0402 1565,3065 r90 top (schematic designator R27)
R28_M0 "RC0402FR-7W33RL" RES-0402 4275,2475 r90 top (schematic designator R28)
R28_M1 "RC0402FR-7W33RL" RES-0402 3010,2485 r90 top (schematic designator R28)
R28_M2 "RC0402FR-7W33RL" RES-0402 1765,2485 r90 top (schematic designator R28)
R29_M0 "RC0402FR-7W33RL" RES-0402 4615,2475 r90 top (schematic designator R29)
R29_M1 "RC0402FR-7W33RL" RES-0402 3350,2485 r90 top (schematic designator R29)
R29_M2 "RC0402FR-7W33RL" RES-0402 2090,2485 r90 top (schematic designator R29)
R30_M0 "RC0402FR-7W33RL" RES-0402 4195,2665 r90 top (schematic designator R30)
R30_M1 "RC0402FR-7W33RL" RES-0402 2930,2675 r90 top (schematic designator R30)
R30_M2 "RC0402FR-7W33RL" RES-0402 1690,2675 r90 top (schematic designator R30)
R31_M0 "RC0402FR-7W33RL" RES-0402 4720,2645 r270 top (schematic designator R31)
R31_M1 "RC0402FR-7W33RL" RES-0402 3455,2655 r270 top (schematic designator R31)
R31_M2 "RC0402FR-7W33RL" RES-0402 2195,2655 r270 top (schematic designator R31)
R32_M0 "RC0402FR-07100RL" RES-0402 3875,2045 r90 top (schematic designator R32)
R32_M1 "RC0402FR-07100RL" RES-0402 2610,2055 r90 top (schematic designator R32)
R32_M2 "RC0402FR-07100RL" RES-0402 1350,2055 r90 top (schematic designator R32)
R33_M0 "RC0402FR-07100RL" RES-0402 4855,2035 r90 top (schematic designator R33)
R33_M1 "RC0402FR-07100RL" RES-0402 3590,2045 r90 top (schematic designator R33)
R33_M2 "RC0402FR-07100RL" RES-0402 2330,2045 r90 top (schematic designator R33)
R34 "RC0402FR-07240RL" RES-0402 5257.59,3870 r0 top
R35 "RC0402FR-0710K5L" RES-0402 5355,3870 r180 top
SW_7V "Comment" TEST-POINT-0001#1 5370,3695 r0 top
SW_M0 "Comment" TEST-POINT-0001#1 4015,3825 r0 top
SW_M1 "Comment" TEST-POINT-0001#1 2765,3815 r0 top
SW_M2 "Comment" TEST-POINT-0001#1 1510,3810 r0 top
TP3_M0 "5003" TEST-POINT-0001#1 4835,3160 r90 top (schematic designator TP3)
TP3_M1 "5003" TEST-POINT-0001#1 3570,3170 r90 top (schematic designator TP3)
TP3_M2 "5003" TEST-POINT-0001#1 2310,3170 r90 top (schematic designator TP3)
TP8 "5003" TEST-POINT-0001#1 3100,2510 r90 top
TP8 "5003" TEST-POINT-0001#1 4365,2500 r90 top
TP8_M2 "5003" TEST-POINT-0001#2 1840,2510 r90 top (schematic designator TP8)
TP9 "5003" TEST-POINT-0001#1 3260,2510 r90 top
TP9 "5003" TEST-POINT-0001#1 4525,2500 r90 top
TP9_M2 "5003" TEST-POINT-0001#1 2000,2510 r90 top (schematic designator TP9)
U1_M0 "TPS54561DPRR" IC-10WSON 4355,4015 r180 top (schematic designator U1)
U1_M1 "TPS54561DPRR" IC-10WSON 3090,4025 r180 top (schematic designator U1)
U1_M2 "TPS54561DPRR" IC-10WSON 1830,4025 r180 top (schematic designator U1)
U2 "LMR16020PDDAR" ? 5602.59,3935 r180 top
U5 "STM32G431CBT6" IC-LQFP48 6760,3015 r270 top
U6 "TCAN1044VDRQ1" IC-8SOIC 6815,2505 r180 top
U7_M0 "UCC27282DRCR" IC-10VSON 3985,2315 r270 top (schematic designator U7)
U7_M1 "UCC27282DRCR" IC-10VSON 2720,2325 r270 top (schematic designator U7)
U7_M2 "UCC27282DRCR" IC-10VSON 1460,2325 r270 top (schematic designator U7)
U8_M0 "UCC27282DRCR" IC-10VSON 4915,2315 r270 top (schematic designator U8)
U8_M1 "UCC27282DRCR" IC-10VSON 3650,2325 r270 top (schematic designator U8)
U8_M2 "UCC27282DRCR" IC-10VSON 2390,2325 r270 top (schematic designator U8)
U9_M0 "SN74LVC2G157DCUR" IC-8VSSOP 3935,2150 r270 top (schematic designator U9)
U9_M1 "SN74LVC2G157DCUR" IC-8VSSOP 2670,2160 r270 top (schematic designator U9)
U9_M2 "SN74LVC2G157DCUR" IC-8VSSOP 1410,2160 r270 top (schematic designator U9)
U10_M0 "SN74LVC2G157DCUR" IC-8VSSOP 4915,2150 r270 top (schematic designator U10)
U10_M1 "SN74LVC2G157DCUR" IC-8VSSOP 3650,2160 r270 top (schematic designator U10)
U10_M2 "SN74LVC2G157DCUR" IC-8VSSOP 2390.63,2159.92 r270 top (schematic designator U10)
VBAT "5003" TEST-POINT-0001#1 6990,4360 r0 top (schematic designator TP1)

## Footprints (in the part's own frame and the unit in brackets; to place one, negate y for a bottom-side part, rotate by r counter-clockwise, add the part's x,y. Pads: shape width x height; smd on the part's side, far side on the other; paste and mask are expansions set on the pad)
43650-0315 [mm]
  round 1.27 hole 1.27 unplated: 1(-6,-1.96) 1(6,-1.96)
  rect 1.482x1.482 / inner rect 1.524x1.524 / far side rect 1.482x1.482 hole 1.02: P$1(3,0)
  round 1.53 / inner round 1.524 / far side round 1.53 hole 1.02: P$2(0,0) P$3(-3,0)
  body extent -6.32,-2.47 6.33,3.14, height 10.03
CAP-47U-0001 [mm]
  rect 3x1.6 smd paste+0 mask+0: 1(-2.2,0) 2(2.2,0)
  silkscreen extent -4.37,-2.75 2.75,2.75, body extent -3.95,-3 3.95,3, height 0.25
CAP-100U-0001 [mm]
  rect 6.5x2.5 smd: 1(-6.25,0) 2(6.25,0)
  silkscreen extent -9.75,-8.5 8.5,8.5, body extent -9.2,-8.5 9.2,8.5, height 16.5
CAP-0402 [mm]
  rect 0.6x0.7 smd: 1(-0.5,0) 2(0.5,0)
  body extent -0.5,-0.22 0.5,0.23, height 0.5
CAP-0603 [mm]
  rect 1.15x1.1 smd: 1(-0.8,0) 2(0.8,0)
  body extent -0.8,-0.45 0.8,0.45, height 0.8
CAP-0805 [mm]
  rect 1.16x1.47 smd: 1(-0.88,0) 2(0.88,0)
  body extent -1,-0.63 1,0.63, height 0.94
CAP-1206 [mm]
  rect 1.25x2 smd: 1(-1.375,0) 2(1.375,0)
  body extent -1.6,-0.8 1.6,0.8, height 1.5
CAP-1210 [mm]
  rect 1.53x2.72 smd: 1(-1.341,0) 2(1.341,0)
  body extent -1.6,-1.25 1.6,1.25, height 2.7
CONN-2POS-0001 [mm]
  round 1.02 hole 1.02 unplated: 1(-3,3.94) 1(3,3.94)
  rect 1.482x1.482 / inner rect 1.524x1.524 / far side rect 1.482x1.482 hole 1.02: 1(0,0)
  round 1.53 / inner round 1.524 / far side round 1.53 hole 1.02: 2(0,3)
  body extent -3.57,-2.42 3.57,6.35, height 9.91
CONN-2POS-0002 [mil]
  round 50 hole 50 unplated: 1(-177.17,-77.17) 1(177.17,-77.17)
  rect 58.33x58.33 / inner rect 60x60 / far side rect 58.33x58.33 hole 40.16: 1(59.06,0)
  round 60.24 / inner round 60 / far side round 60.24 hole 40.16: 2(-59.06,0)
  body extent -190,-97 190,123, height 395
CONN-3POS-0001 [mm] "Pin Header, pitch 2.54 mm, THT, Vertical, single row, 3p"
  rrect50% 1.6x1.6 hole 1.1: 1(-2.54,0)
  round 1.6 hole 1.1: 2(0,0) 3(2.54,0)
  silkscreen extent -4.57,-1.35 3.96,1.35, body extent -3.81,-1.27 3.81,1.27, height 8.57
CONN-4POS-0002 [mm]
  round 1.02 hole 1.02 unplated: 1(-4.5,3.94) 1(4.5,3.94)
  rect 1.482x1.482 / inner rect 1.524x1.524 / far side rect 1.482x1.482 hole 1.02: 1(1.5,0)
  round 1.53 / inner round 1.524 / far side round 1.53 hole 1.02: 2(-1.5,0) 3(1.5,3) 4(-1.5,3)
  body extent -5.07,-2.45 5.08,6.32, height 10.03
CONN-6POS-0001 [mm]
  rect 1.482x1.482 / inner rect 1.524x1.524 / far side rect 1.482x1.482 hole 1.02: 1(3,0)
  round 1.53 / inner round 1.524 / far side round 1.53 hole 1.02: 2(0,0) 3(-3,0) 4(3,3) 5(0,3) 6(-3,3)
  round 1.02 hole 1.02 unplated: ""(-6,3.94) ""(6,3.94)
  body extent -6.57,-2.45 6.58,6.32, height 10.03
DIO-SOD128 [mm]
  rect 2x1.4 smd: 1(0,2.2) 2(0,-2.2)
  silkscreen extent -0.12,-3.55 0.13,-3.3, body extent -1.25,-2.35 1.25,2.35, height 1.05
"DO-214AA (SMBJ)" [mm]
  rect 2.16x2.26 smd: 1(-2.416,0) 2(2.484,0)
  silkscreen extent 3.94,-0.12 4.19,0.13, body extent -2.72,-1.95 2.78,1.95, height 2.45
DO-POWERDI5 [mm] "SMD, 3-Leads, Body 3.975x5.375mm, Pitch 1.84mm"
  rect 1.4x1.39 smd: 1(-2.856,-0.92) 1(-2.856,0.92)
  rect 4.86x3.36 smd: 2(1.126,0)
  silkscreen extent 3.94,-0.12 4.19,0.12, body extent -3.25,-1.98 3.25,1.98, height 1.15
FUSE-0001 [mil]
  rect 167x150 smd paste+0 mask+0: 1(-125.5,0) 2(125.5,0)
  silkscreen extent -192,-99 192,99, body extent -213,-103 213,103, height 10
IC-8SOIC [mm]
  rect 0.6x1.5 smd: 1(-1.905,-2.5) 2(-0.635,-2.5) 3(0.635,-2.5) 4(1.905,-2.5) 5(1.905,2.5) 6(0.635,2.5) 7(-0.635,2.5) 8(-1.905,2.5)
  silkscreen extent -2.03,-3.93 -1.78,-3.69, body extent -2.45,-3 2.45,3, height 1.75
IC-8VSONCLIP [mm]
  rect 0.4x0.7 smd paste-100 mask+0.05: 1(2.812,0.877) 2(0.862,0.877) 2(1.512,0.877) 2(2.162,0.877) 3(0.862,4.077) 3(1.512,4.077) 3(2.162,4.077) 3(2.812,4.077)
  rect 2.45x1.9 smd paste-100 mask+0.05: 3(1.837,2.917)
  silkscreen extent 0.19,0.03 3.49,4.18, body extent 0.18,0.89 3.48,4.19, height 1.1
IC-8VSSOP [mm]
  rect 0.75x0.25 smd: 1(0,1.5) 2(0,1) 3(0,0.5) 4(0,0) 5(3.3,0) 6(3.3,0.5) 7(3.3,1) 8(3.3,1.5)
  silkscreen extent -1.02,1.4 -0.76,1.65, body extent 0.1,-0.24 3.2,1.76, height 0.9
IC-10VSON [mm]
  rrect25% 0.6x0.24 smd mask+0: 1(-1.4,1) 2(-1.4,0.5) 3(-1.4,0) 4(-1.4,-0.5) 5(-1.4,-1) 6(1.4,-1) 7(1.4,-0.5) 8(1.4,0) 9(1.4,0.5) 10(1.4,1)
  round 0.368 hole 0.2 mask+0: 11(-0.508,0) 11(0,0.889) 11(0,-0.889) 11(0.508,0)
  rrect5% 1.65x2.4 smd paste-2 mask+0: 11(0,0)
  Top Layer region: 0.375,1.2 0.825,1.2 0.825,-1.2 0.375,-1.2 0.375,-1.7 0.125,-1.7 0.125,-1.2 -0.125,-1.2 -0.125,-1.7 -0.375,-1.7 -0.375,-1.2 -0.825,-1.2 -0.825,1.2 -0.375,1.2 -0.375,1.7 -0.125,1.7 -0.125,1.2 0.125,1.2 0.125,1.7 0.375,1.7
  silkscreen extent -2.39,-1.5 1.5,1.5, body extent -1.48,-1.48 1.52,1.52, height 1
IC-10WSON [mm]
  rect 0.6x0.3 smd: 1(-1.9,1.6) 2(-1.9,0.8) 3(-1.9,0) 4(-1.9,-0.8) 5(-1.9,-1.6) 6(1.9,-1.6) 7(1.9,-0.8) 8(1.9,0) 9(1.9,0.8) 10(1.9,1.6)
  rect 2.6x3 smd: 11(0,0)
  body extent -2,-2 2,2, height 0.8
IC-LQFP48 [mil]
  rect 47x12 smd paste+0 mask+0: 1(-167.32,108.27) 2(-167.32,88.58) 3(-167.32,68.9) 4(-167.32,49.21) 5(-167.32,29.53) 6(-167.32,9.84) 7(-167.32,-9.84) 8(-167.32,-29.53) 9(-167.32,-49.21) 10(-167.32,-68.9) 11(-167.32,-88.58) 12(-167.32,-108.27) 25(167.32,-108.27) 26(167.32,-88.58) 27(167.32,-68.9) 28(167.32,-49.21) 29(167.32,-29.53) 30(167.32,-9.84) 31(167.32,9.84) 32(167.32,29.53) 33(167.32,49.21) 34(167.32,68.9) 35(167.32,88.58) 36(167.32,108.27)
  rect 12x47 smd paste+0 mask+0: 13(-108.27,-167.32) 14(-88.58,-167.32) 15(-68.9,-167.32) 16(-49.21,-167.32) 17(-29.53,-167.32) 18(-9.84,-167.32) 19(9.84,-167.32) 20(29.53,-167.32) 21(49.21,-167.32) 22(68.9,-167.32) 23(88.58,-167.32) 24(108.27,-167.32) 37(108.27,167.32) 38(88.58,167.32) 39(68.9,167.32) 40(49.21,167.32) 41(29.53,167.32) 42(9.84,167.32) 43(-9.84,167.32) 44(-29.53,167.32) 45(-49.21,167.32) 46(-68.9,167.32) 47(-88.58,167.32) 48(-108.27,167.32)
  silkscreen extent -214,-211 211,211, body extent -177,-177 177,177, height 63
IC-SOT23-3 [mm]
  rect 0.6x0.7 smd: 1(-0.95,-1) 2(0.95,-1) 3(0,1)
  body extent -1.46,-1.18 1.46,1.19, height 1.12
IC-SOT-223-4 [mm]
  rect 1.4x1.2 smd mask+0.07: 1(-3,2.3) 3(-3,-2.3) 4(-3,0)
  rect 1.4x3.5 smd: 2(3,0)
  body extent -3.5,-3.25 3.5,3.25, height 1.68
IND-15U-0002 [mm] "12V Buck"
  rect 3.3x3.4 smd paste+0 mask+0: 1(3.175,7.62) 1(8.001,7.62) 2(3.175,1.524) 2(8.001,1.524)
  silkscreen extent 5.08,-0.25 6.11,9.4, body extent -0.19,-0.33 11.11,9.47, height 10.79
IND-15UH-0001 [mil] "7v Buck"
  rect 63x126 smd paste+0 mask+0: 1(-175.5,0) 2(175.5,0)
  Top Layer keep-out region: -135,-201 -135,201 135,201 135,-201
  silkscreen extent -212,-208 212,208, body extent -206,-203 206,203, height 158
LED-0603 [mm]
  rect 0.8x0.8 smd: 1(2.291,0.751) 2(0.589,0.751)
  silkscreen extent -0.2,0.34 1.52,1.13, body extent 0.65,0.36 2.25,1.16, height 0.39
RES-0402 [mm]
  rect 0.6x0.7 smd: 1(-0.5,0) 2(0.5,0)
  body extent -0.5,-0.25 0.5,0.25, height 0.3
RES-0603 [mm]
  rect 1.15x1.1 smd: 1(-0.8,0) 2(0.8,0)
  body extent -0.8,-0.4 0.8,0.4, height 0.43
RES-1210 [mm] "Chip Resistor, 2-Leads, Body 3.10x2.60mm, IPC High Density"
  rect 0.95x2.6 smd: 1(-1.275,0) 2(1.275,0)
  body extent -1.6,-1.35 1.6,1.35, height 0.6
SMA_DIO [mm]
  rect 2.18x1.63 smd paste+0 mask+0: 1(-1.857,0) 2(1.857,0)
  Top Layer keep-out region: -0.635,-0.917 -0.635,0.917 0.635,0.917 0.635,-0.917
  Top Layer keep-out region: -2.744,0.917 -2.744,1.409 2.744,1.409 2.744,0.917
  Top Layer keep-out region: -2.744,-1.409 -2.744,-0.917 2.744,-0.917 2.744,-1.409
  Keep-Out Layer region: -0.635,-0.866 -0.635,0.866 0.635,0.866 0.635,-0.866
  silkscreen extent -3.51,-1.59 2.92,1.59, body extent -2.8,-1.46 2.8,1.46, height 2.35
TEST-POINT-0001#1 [mm] "2024 miniature test point"
  round 1.3 hole 1: 1(0,0)
  body extent -1.27,-1.27 1.27,1.27, height 4.57
TEST-POINT-0001#2 [mm] "2024 miniature test point"
  round 1.3 hole 1: ""(0,0)
  body extent -1.27,-1.27 1.27,1.27, height 4.57
? [mm]
  rrect5% 1.55x0.6 smd mask+0: 1(-2.7,1.905) 2(-2.7,0.635) 3(-2.7,-0.635) 4(-2.7,-1.905) 5(2.7,-1.905) 6(2.7,-0.635) 7(2.7,0.635) 8(2.7,1.905)
  round 0.368 hole 0.2: 9(-0.65,1.95) 9(-0.65,0.65) 9(-0.65,-0.65) 9(-0.65,-1.95) 9(0.65,1.95) 9(0.65,0.65) 9(0.65,-0.65) 9(0.65,-1.95)
  rect 2.95x4.9 smd paste-3 mask+0: 9(0,0)
  silkscreen extent -4.17,-2.52 1.95,2.52, body extent -3,-2.45 3,2.45, height 1.7